# Altium PCB Kasli-DIOT.PCBDOC (part 15 of 23)
Units mm, origin at the board's own origin, x right, y up, seen from the top; angles counter-clockwise.
Board outline 222.9 x 100 mm, 10 copper layers (TopLayer, Layer 2, Layer 3, Layer 4, Layer 5, Layer 6, Layer 7, layer 8, Layer 9, BottomLayer), stack 1.564 mm thick; 977 components, 900 nets, 4676 pads, 2725 vias.
Unrouted connection lines stored in the file: 17.
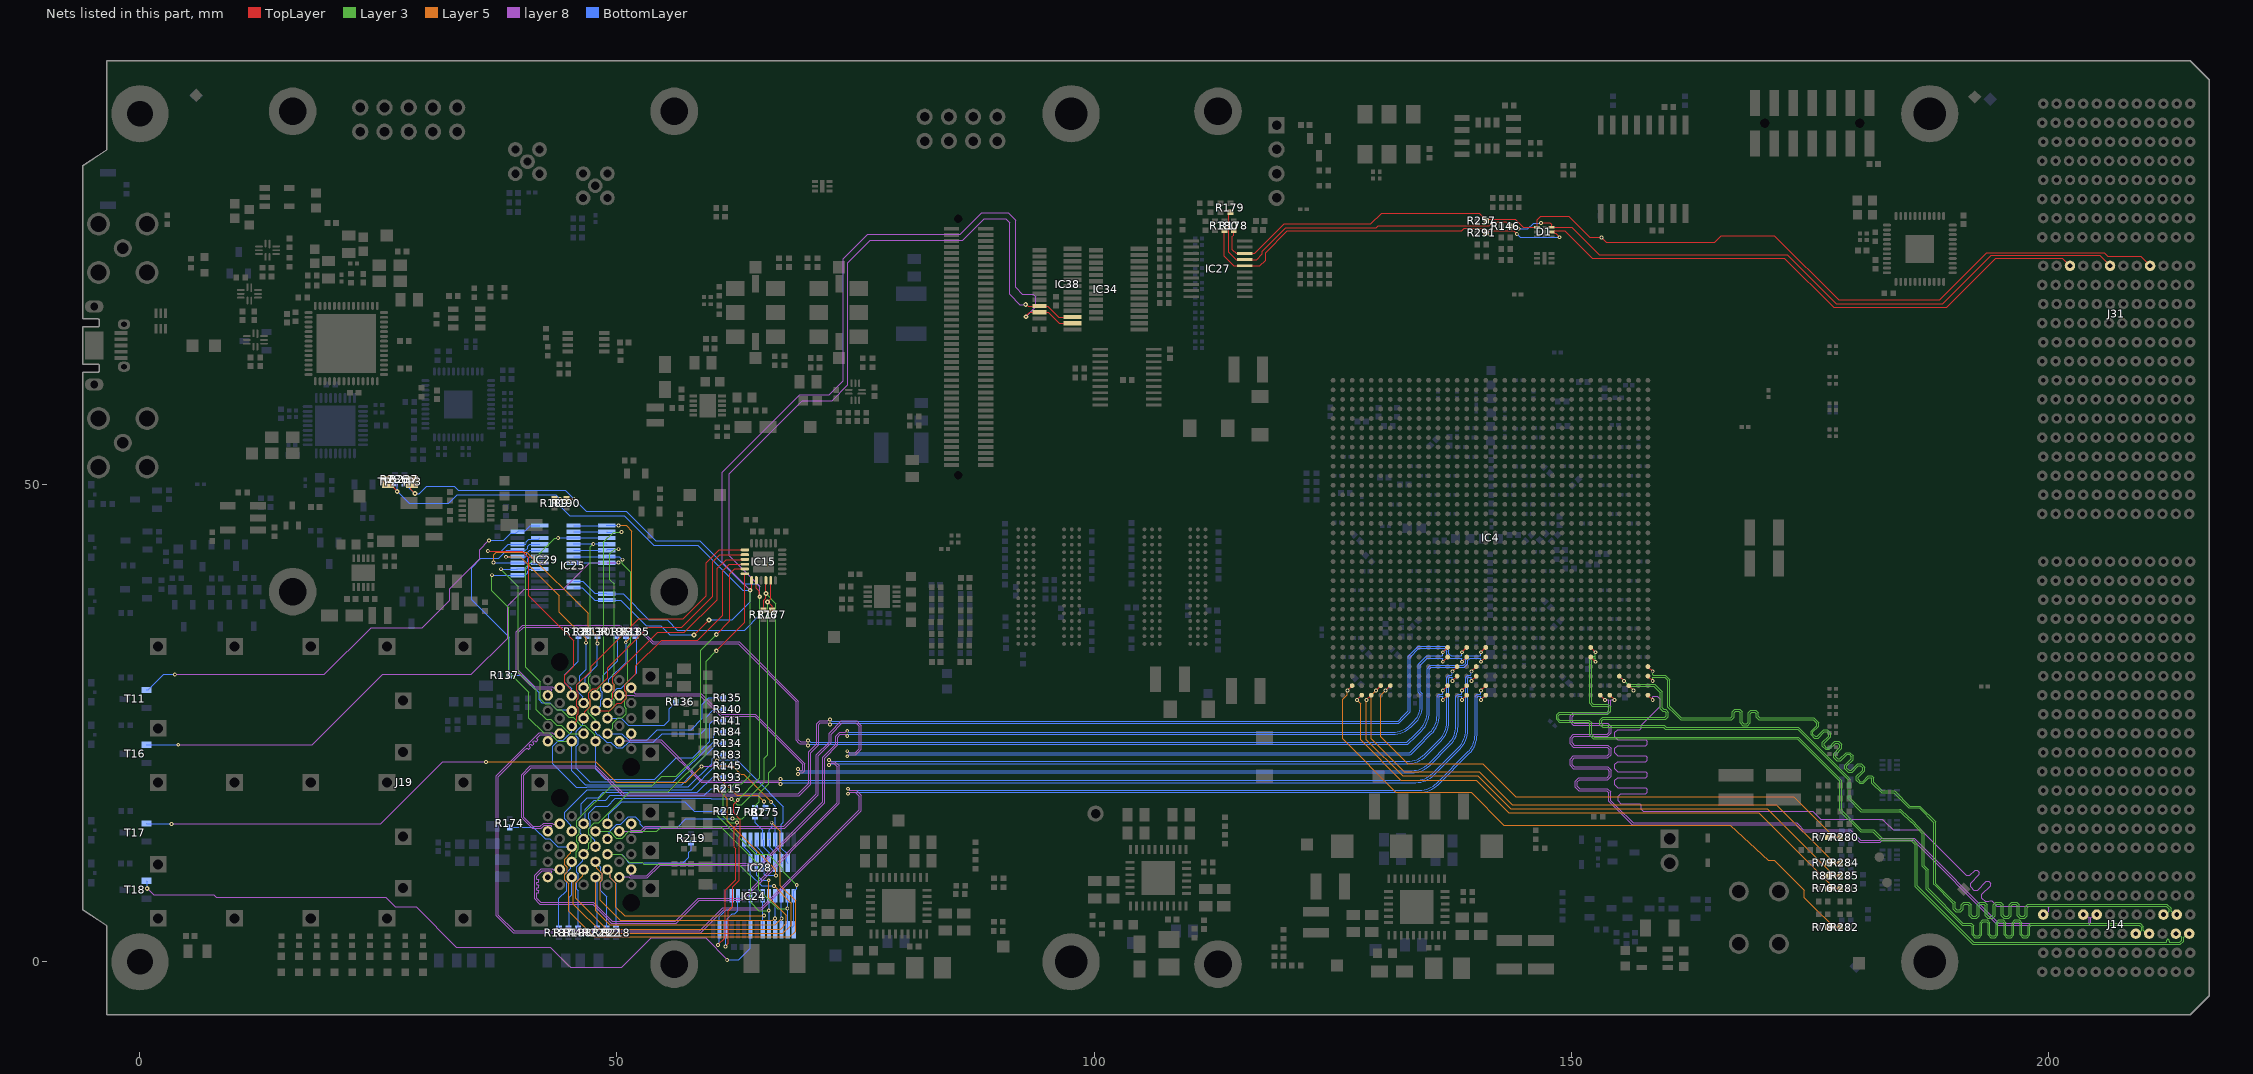
[diagram p21: the nets of this part, all layers, seen from the top]

## Via types
v1: diameter 0.4, hole 0.2, TopLayer to BottomLayer, tented both sides, 1723 vias
v2: diameter 0.5, hole 0.2, TopLayer to BottomLayer, tented both sides, 524 vias
v3: diameter 0.6, hole 0.3, TopLayer to BottomLayer, tented both sides, 172 vias
v4: diameter 0.6, hole 0.3, TopLayer to BottomLayer, 113 vias
v5: diameter 0.5, hole 0.2, TopLayer to BottomLayer, 107 vias
v6: diameter 0.4, hole 0.2, TopLayer to BottomLayer, 67 vias
v7: diameter 0.5, hole 0.25, TopLayer to BottomLayer, tented both sides, 12 vias
v8: diameter 0.8, hole 0.5, TopLayer to BottomLayer, tented both sides, 7 vias

## Nets (pads, with @x,y where several pads share a name; then routed paths per layer and width w, separated by ;. In a path a pad name is that pad's centre, name@x,y a point inside that pad or via, vN(x,y) a via of type N, cw(c..) or ccw(c..) an arc to the next point about the centre after c; other vN are vias at no path point) (continued)
SERVMOD.6_SERVMOD: D1.1 IC27.18 J31.D6 R178.1 R257.2 | length 108.6
  TopLayer w0.127: R178.1@114.647,76.689 114.647,76.174 114.51,76.037 114.51,74.648 114.897,74.261 IC27.18@115.797,74.261 116.835,74.261 119.922,77.347 129.015,77.347 130.139,78.471 140.358,78.471 141.132,77.697 R257.2@141.132,77.677 141.292,77.837 144.142,77.837 144.979,77 D1.1@146.451,77 146.451,77.771 146.832,78.152 149.755,78.152 151.982,75.925 v1(153.186,75.925) 153.673,75.438 165.074,75.438 165.748,76.112 171.329,76.112 178.038,69.403 188.674,69.403 193.575,74.304 205.907,74.304 206.261,73.95 209.7,73.95 J31.D6@210.7,72.95
SERVMOD.7_SERVMOD: D1.6 IC27.17 J31.G6 R146.2 R179.1 | length 105.6
  TopLayer w0.127: R179.1@114.286,78.593 114.142,78.448 114.142,74.366 114.897,73.611 IC27.17@115.797,73.611 117.039,73.611 117.648,74.22 117.648,74.5 120.098,76.95 129.597,76.95 129.781,77.134 141.42,77.134 141.852,77.566 143.171,77.566 143.625,77.112 R146.2@143.625,77.092 144.234,77.092 v1@144.511,76.816 ; v1(146.849,77.438) 146.876,77.466 147.793,77.466 147.971,77.288 D1.6@147.971,77 ; D1.6@147.977,77.006 150.079,77.006 152.955,74.13 172.664,74.13 177.814,68.981 188.973,68.981 194.042,74.05 205.4,74.05 J31.G6@206.5,72.95
  BottomLayer w0.127: v1(144.525,76.83) 145.459,76.83 146.067,77.438 v1(146.849,77.438)
SERVMOD.8_SERVMOD: D1.5 IC27.16 J31.J6 R180.1 R291.2 | length 102
  TopLayer w0.127: R180.1@113.659,76.689 113.659,73.948 114.647,72.961 IC27.16@115.797,72.961 117.389,72.961 117.986,73.558 117.986,74.345 120.281,76.639 138.563,76.639 138.832,76.907 140.543,76.907 140.565,76.885 140.694,76.885 141.132,76.448 R291.2@141.132,76.428 141.314,76.61 144.003,76.61 v1(144.318,76.295) ; D1.5@147.971,76.5 D1.5@148.136,76.5 ; v1(148.805,75.949) 148.4,76.354 148.282,76.354 D1.5@148.136,76.5 ; J31.J6@202.3,72.95 201.5,73.75 194.518,73.75 189.366,68.598 177.537,68.598 172.367,73.767 152.219,73.767 149.339,76.647 148.283,76.647 D1.5@148.136,76.5
  BottomLayer w0.127: v1(144.318,76.295) 144.672,75.941 148.797,75.941 v1(148.805,75.949)
SFP_0.LED: IC25.28 IC29.11 T11.1 | length 49.6
  layer 8 w0.1: v1(3.651,30.12) 19.331,30.12 24.245,35.034 29.574,35.034 32.465,37.925 32.465,39.099 35.591,42.224 35.591,43.187 v1(36.568,44.165)
  BottomLayer w0.1: T11.1@0.661,28.5 0.861,28.5 2.481,30.12 v1(3.651,30.12) ; v1(36.568,44.165) 36.57,44.163 38.124,44.163 38.861,44.9 39.383,44.9 39.681,45.198 40.374,45.198 40.891,45.716 41.898,45.716 IC25.28@41.908,45.725
SFP_0.LOS: IC25.26 IC29.9 J19.LB8 R138.1 | length 34.9
  TopLayer w0.125: v1(36.461,43.05) 40.061,43.05 40.761,42.35 40.761,38.35 45.461,33.65 45.461,30.96 44.514,30.013 44.514,29.242 45.167,28.589 45.167,28.008 J19.LB8@45.25,27.925
  BottomLayer w0.125: v1(36.461,43.05) 37.861,43.05 38.586,43.775 IC29.9@39.558,43.775 40.438,43.775 40.511,43.848 40.511,44.05 40.759,44.298 41.781,44.298 IC25.26@41.908,44.425 ; J19.LB8@45.25,27.925 45.25,28.624 45.061,28.813 44.955,28.813 44.537,29.23 44.537,30.099 45.947,31.508 R138.1@45.947,34.125
SFP_0.MOD_PRESENT: IC25.25 IC29.8 J19.LB6 R137.1 | length 29.9
  BottomLayer w0.125: IC25.25@41.908,43.775 40.861,43.775 40.636,43.55 40.636,43.372 40.397,43.133 39.566,43.133 IC29.8@39.558,43.125 38.436,43.125 37.591,42.28 35.741,42.28 34.761,41.3 34.761,37.945 38.701,34.005 R137.1@38.701,30.02 40.041,30.02 41.836,28.225 41.836,27.45 42.137,27.149 42.968,27.149 43.71,26.408 45.324,26.408 J19.LB6@45.411,26.32
SFP_0.RATE_SELECT: IC25.24 IC29.7 J19.LB7 R213.2 | length 25.1
  Layer 5 w0.125: v1(38.361,42.45) 39.861,42.45 43.961,38.35 43.961,36.65 46.761,33.85 v1(46.761,33.45)
  BottomLayer w0.125: v1(38.361,42.45) 39.533,42.45 IC29.7@39.558,42.475 40.436,42.475 40.561,42.6 40.561,42.825 40.869,43.133 41.9,43.133 IC25.24@41.908,43.125 ; J19.LB7@46.5,27.125 46.428,27.197 46.428,27.789 45.787,28.43 45.787,29.02 46.08,29.312 46.08,29.994 46.761,30.675 v1(46.761,33.45) 46.761,33.939 R213.2@46.947,34.125
SFP_0.RATE_SELECT1: IC25.23 IC29.6 J19.LB9 R130.2 | length 28.3
  Layer 5 w0.125: v1(37.061,41.85) 37.061,42.65 37.361,42.95 40.561,42.95 46.961,36.55 46.961,35.15 47.947,34.164 v1(47.947,33.35)
  BottomLayer w0.125: v1(37.061,41.85) 39.533,41.85 IC29.6@39.558,41.825 40.486,41.825 40.661,42 40.661,42.275 40.861,42.475 IC25.23@41.908,42.475 ; J19.LB9@46.661,28.72 46.661,29.8 47.947,31.086 v1(47.947,33.35) R130.2@47.947,34.125
SFP_0.SCL: IC15.2 J19.LB5 R184.1 | length 52.5
  TopLayer w0.125: J19.LB5@46.5,25.525 46.607,25.632 46.607,26.189 47.217,26.799 47.217,27.42 47.037,27.599 47.037,28.22 47.455,28.638 47.888,28.638 49.036,29.785 49.036,30.825 53.261,35.05 56.768,35.05 60.036,38.318 60.036,41.925 60.79,42.679 IC15.2@63.411,42.679
  BottomLayer w0.125: J19.LB5@46.5,25.525 46.428,25.453 46.428,24.861 45.736,24.169 45.736,23.649 45.962,23.423 45.962,22.83 45.736,22.603 45.736,20.275 47.161,18.85 55.918,18.85 60.142,23.073 60.142,23.781 60.453,24.092 R184.1@61.136,24.092
SFP_0.SDA: IC15.1 J19.LB4 R183.1 | length 56.2
  TopLayer w0.125: J19.LB4@45.25,24.725 45.787,25.263 45.787,25.82 45.962,25.995 45.962,26.62 45.787,26.795 45.787,27.455 45.962,27.63 45.962,28.22 45.787,28.395 45.787,29.02 47.283,30.516 47.283,30.96 52.273,35.95 56.941,35.95 59.361,38.37 59.361,41.825 60.715,43.179 IC15.1@63.411,43.179
  BottomLayer w0.125: J19.LB4@45.411,24.725 45.231,24.545 45.231,24.094 45.011,23.873 44.767,23.649 ccw(c45.25,23.125) 44.731,23.613 44.423,23.286 44.35,23.213 44.298,23.213 43.88,23.213 43.287,22.62 43.287,20.749 45.736,18.3 46.839,18.3 46.864,18.325 57.486,18.325 59.978,20.817 59.978,21.267 60.367,21.656 R183.1@61.136,21.656
SFP_0.TX_DISABLE: IC25.22 IC29.5 J19.LB3 | length 26.9
  Layer 3 w0.125: v1(37.837,41.158) 39.661,39.334 39.661,30.35 41.561,28.45 41.561,26.436 42.559,25.438 43.056,25.438 43.681,24.813 44.138,24.813 45.026,23.925 J19.LB3@46.661,23.925
  BottomLayer w0.125: v1(37.837,41.158) 39.54,41.158 IC29.5@39.558,41.175 40.486,41.175 40.636,41.325 40.636,41.55 40.869,41.783 41.865,41.783 IC25.22@41.908,41.825
SFP_0.TX_FAULT: IC25.21 IC29.4 J19.LB2 R134.1 | length 49.3
  Layer 3 w0.125: v1(36.911,40.525) 36.861,40.475 36.861,38.886 38.636,37.111 38.636,30.375 40.761,28.25 40.761,25.549 42.297,24.013 42.885,24.013 43.772,23.125 J19.LB2@45.411,23.125
  BottomLayer w0.125: v1(36.911,40.525) IC29.4@39.558,40.525 39.566,40.533 40.397,40.533 40.636,40.772 40.636,40.925 40.869,41.158 41.89,41.158 IC25.21@41.907,41.174 ; J19.LB2@45.25,23.125 45.25,20.011 46.686,18.575 56.786,18.575 57.911,19.7 57.911,20.239 60.576,22.904 R134.1@61.136,22.904
SFP_1.LED: IC25.7 IC29.19 T16.1 | length 63.5
  layer 8 w0.1: v1(4.011,22.75) 18.061,22.75 25.431,30.12 34.731,30.12 38.536,33.925 38.536,37.337 40.274,39.075 44.368,39.075 47.143,41.85 v1(50.161,41.85)
  BottomLayer w0.1: T16.1@0.661,22.75 v1(4.011,22.75) ; IC29.19@45.458,41.825 IC25.7@48.253,41.825 ; IC25.7@48.908,41.825 48.933,41.85 v1(50.161,41.85)
SFP_1.LOS: IC25.6 IC29.18 J19.LT8 R135.1 | length 39.7
  Layer 3 w0.1: J19.LT8@49,23.925 49.55,24.475 49.55,25.015 50.125,25.59 50.544,25.59 50.95,25.996 50.95,26.55 ; v1(50.561,42.15) 50.561,41.75 51.461,40.85 51.461,33.45 51.111,33.1 51.111,29.326 50.8,29.015 50.8,28.435 51,28.235 51,27.615 50.8,27.415 50.8,26.758 cw(c50.25,26.325) 50.834,26.711 50.922,26.578 50.95,26.55
  BottomLayer w0.1: IC25.6@48.908,42.475 50.236,42.475 v1(50.561,42.15) ; J19.LT8@49.161,23.925 50.51,23.925 51.21,23.225 53.111,23.225 54.236,24.35 57.761,24.35 58.961,25.55 58.961,26.975 59.642,27.656 R135.1@61.136,27.656
  BottomLayer w0.125: IC29.18@45.458,42.475 IC25.6@48.271,42.475
SFP_1.MOD_PRESENT: IC25.5 IC29.17 J19.LT6 R136.1 | length 32.3
  Layer 3 w0.125: J19.LT6@49.161,25.525 49.161,26.275 49.537,26.652 49.537,26.655 49.712,26.83 49.712,27.449 49.451,27.711 49.451,28.133 49.712,28.395 49.712,29.02 49.705,29.027 49.705,29.062 49.537,29.23 49.537,30.114 49.698,30.275 49.698,39.613 49.261,40.05 49.261,42.75 49.761,43.25 v1(50.161,43.25)
  BottomLayer w0.125: IC29.17@45.458,43.125 IC25.5@48.332,43.125 ; IC25.5@48.908,43.125 49.033,43.25 v1(50.161,43.25) ; J19.LT6@49.161,25.52 49.166,25.525 50.467,25.525 51.185,24.808 54.968,24.808 55.461,25.3 55.461,26.545 56.146,27.23 R136.1@56.146,27.25
SFP_1.RATE_SELECT: IC25.4 IC29.16 J19.LT7 R140.2 | length 40.6
  Layer 3 w0.1: v1(47.518,43.795) 47.211,43.488 47.211,29.976 47.05,29.815 47.05,29.165 47.2,29.015 47.2,28.736 47.211,28.725 47.211,28.376 47.05,28.215 47.05,27.635 47.214,27.471 47.214,27.378 47.211,27.375 47.211,26.776 46.983,26.548 46.983,26.102 47.719,25.366 47.719,24.756 J19.LT7@47.75,24.725 ; J19.LT7@47.821,24.815 J19.LT7@47.911,24.725
  BottomLayer w0.1: IC29.16@45.458,43.775 45.478,43.795 v1(47.518,43.795) 48.887,43.795 IC25.4@48.908,43.775 ; J19.LT7@47.75,24.725 47.75,24.015 47.94,23.825 48.11,23.825 48.91,23.025 49.36,23.025 49.96,22.425 50.61,22.425 51.21,23.025 51.951,23.025 51.966,23.01 53.821,23.01 54.736,23.925 58.761,23.925 59.336,24.5 59.336,25.65 60.154,26.468 R140.2@61.136,26.468
SFP_1.RATE_SELECT1: IC25.3 IC29.15 J19.LT9 R141.2 | length 51.7
  Layer 3 w0.125: v1(43.833,44.425) 43.78,44.373 43.484,44.373 40.461,41.35 40.461,30.85 41.956,29.355 41.956,28.933 41.954,28.93 41.954,28.494 41.954,27.565 42.481,27.038 43.062,27.038 43.687,26.413 44.135,26.413 44.935,25.613 45.395,25.613 46.195,24.813 46.637,24.813 47.66,23.789 47.66,23.376 J19.LT9@47.911,23.125
  BottomLayer w0.125: v1(43.833,44.425) IC29.15@45.457,44.425 ; IC29.15@45.458,44.425 IC25.3@48,44.425 ; J19.LT9@47.75,23.125 47.75,20.161 48.761,19.15 53.961,19.15 56.201,21.39 57.959,21.39 59.711,23.142 59.711,24.936 60.054,25.28 R141.2@61.136,25.28 ; IC25.3@48.908,44.425 IC25.3@48.933,44.45
SFP_1.SCL: IC15.4 J19.LT5 R186.1 | length 35
  TopLayer w0.125: J19.LT5@47.911,26.32 49.237,26.32 50.037,27.12 50.453,27.12 50.962,27.63 50.962,28.238 50.787,28.413 50.787,29.02 51.97,30.203 51.97,31.009 54.686,33.725 58.461,33.725 61.086,36.35 61.086,40.975 61.79,41.679 IC15.4@63.411,41.679
  BottomLayer w0.125: J19.LT5@47.75,26.325 48.287,26.863 48.287,27.454 48.462,27.629 48.462,28.255 48.287,28.43 48.287,29.02 48.536,29.269 48.536,30.05 50.061,31.575 R186.1@50.061,34.125
SFP_1.SDA: IC15.3 J19.LT4 R185.1 | length 32.5
  TopLayer w0.125: J19.LT4@49,27.125 49.033,27.125 49.537,27.63 49.537,28.255 49.712,28.43 49.712,29.038 49.537,29.213 49.537,29.82 54.25,34.533 57.066,34.533 60.511,37.978 60.511,41.25 61.431,42.17 IC15.3@63.403,42.17
  BottomLayer w0.125: J19.LT4@49,27.125 49.033,27.125 49.537,27.63 49.537,28.22 50.018,28.701 50.438,28.701 52.061,30.324 R185.1@52.061,34.125
SFP_1.TX_DISABLE: IC25.2 IC29.14 J19.LT3 | length 22.8
  Layer 3 w0.125: J19.LT3@47.911,27.925 47.931,27.945 47.931,28.537 48.287,28.894 48.287,29.02 48.623,29.356 48.623,44.013 49.661,45.05 v1(50.461,45.05)
  BottomLayer w0.125: IC29.14@45.458,45.075 IC25.2@48.078,45.075 ; IC25.2@48.908,45.075 48.933,45.05 v1(50.461,45.05)
SFP_1.TX_FAULT: IC25.1 IC29.13 J19.LT2 R133.1 | length 23.6
  Layer 5 w0.125: v1(50.161,45.75) 50.961,45.75 51.561,45.15 51.561,34.129 v1(50.922,33.489)
  BottomLayer w0.125: IC29.13@45.458,45.725 IC25.1@48.096,45.725 ; IC25.1@48.908,45.725 48.933,45.75 v1(50.161,45.75) ; J19.LT2@49.161,28.72 49.161,29.625 50.945,31.409 R133.1@50.945,34.124
SFP_2.A_RATE_SELECT: IC24.24 IC28.7 R82.1 | length 5.3
  BottomLayer w0.125: R82.1@64.486,15.19 64.486,14.579 65.286,13.779 IC28.7@65.286,12.825 ; IC28.7@65.375,12.736 65.375,11.986 65.936,11.425 IC24.24@65.936,10.35
SFP_2.LED: IC24.27 IC28.10 T17.1 | length 79.6
  Layer 5 w0.1: v1(36.277,20.95) 47.761,20.95 49.906,18.805 57.191,18.805 v1(58.861,20.475)
  layer 8 w0.1: v1(3.288,14.45) 25.261,14.45 31.761,20.95 v1(36.277,20.95) ; v1(58.861,20.475) 59.863,20.475 v1(60.481,21.093)
  BottomLayer w0.1: T17.1@0.661,14.5 0.711,14.45 v1(3.288,14.45)
  BottomLayer w0.125: v1(60.481,21.093) 60.547,21.159 62.529,21.159 64.467,19.222 64.467,19.219 67.424,16.262 67.424,14.613 67.236,14.425 IC28.10@67.236,12.825 67.236,11.9 67.77,11.366 67.77,10.466 IC24.27@67.886,10.35
SFP_2.LOS: IC24.26 IC28.9 J19.RB8 R145.1 | length 35
  Layer 5 w0.125: v1(60.566,20.528) 62.083,20.528 62.961,19.65 63.274,19.65 66.161,16.763 v1(66.161,16.75)
  BottomLayer w0.125: J19.RB8@45.25,13.675 45.178,13.747 45.178,14.339 44.537,14.98 44.537,15.68 46.907,18.05 57.811,18.05 60.289,20.528 v1(60.566,20.528) R145.1@61.136,20.528 ; J19.RB8@45.389,13.739 ccw(c45.513,13.747) J19.RB8@45.411,13.675 ; v1(66.161,16.75) 66.586,16.325 IC28.9@66.586,12.825 ; IC28.9@66.625,12.786 66.625,11.986 67.222,11.389 67.222,10.364 IC24.26@67.236,10.35 ; IC24.26@67.214,10.328 IC24.26@67.275,10.267
SFP_2.MOD_PRESENT: IC24.25 IC28.8 J19.RB6 R174.1 | length 56.9
  Layer 5 w0.125: J19.RB6@45.25,12.075 45.178,12.003 45.178,11.411 44.537,10.77 44.537,10.18 44.81,9.907 44.81,9.443 44.537,9.17 44.537,8.58 44.93,8.188 44.93,5.281 47.598,2.613 68.124,2.613 68.727,3.216 68.727,6.384 67.136,7.975 67.136,13.666 v1(66.215,14.586)
  BottomLayer w0.125: R174.1@38.761,14.08 38.773,14.092 41.2,14.092 41.887,13.405 41.966,13.405 42.472,12.899 42.969,12.899 43.792,12.075 J19.RB6@45.241,12.075 ; IC28.8@65.936,12.825 65.936,13.825 66.261,14.15 66.261,14.541 v1(66.215,14.586) ; IC28.8@66,12.761 66,11.986 66.586,11.4 IC24.25@66.586,10.35
SFP_2.RATE_SELECT: J19.RB7 R82.2 R175.2 R193.2 | length 28.1
  Layer 5 w0.125: v1(60.533,19.476) 62.559,17.45 64.761,17.45 v1(65.411,16.8)
  BottomLayer w0.125: J19.RB7@46.5,12.875 46.5,13.075 46.123,13.452 46.123,13.844 45.787,14.18 45.787,14.77 46.261,15.244 46.261,16.58 46.764,17.083 46.764,17.103 46.877,17.216 48.027,17.216 48.561,17.75 58.436,17.75 60.162,19.476 v1(60.533,19.476) 61,19.476 R193.2@61.136,19.34 ; R82.2@64.486,16.13 R175.2@65.56,16.13 65.411,16.278 v1(65.411,16.8)
SFP_2.RATE_SELECT1: IC24.23 IC28.6 J19.RB9 R215.2 | length 33.7
  Layer 5 w0.125: v1(60.499,18.166) 61.561,17.104 61.561,14.75 66.661,9.65 v1(66.661,9.05)
  BottomLayer w0.125: J19.RB9@46.661,14.47 46.661,15.98 47.631,16.95 48.811,16.95 49.311,17.45 59.161,17.45 59.877,18.166 v1(60.499,18.166) 61.122,18.166 R215.2@61.136,18.152 ; IC28.6@64.7,12.761 64.7,11.986 65.286,11.4 IC24.23@65.286,10.35 65.449,10.188 65.449,9.162 65.561,9.05 v1(66.661,9.05)
SFP_2.SCL: IC15.6 J19.RB5 R188.1 | length 47.8
  TopLayer w0.125: v5(60.411,32.6) 63.411,35.6 IC15.6@63.411,40.679 IC15.6@63.13,40.679
  Layer 3 w0.125: J19.RB5@46.661,11.275 46.661,11.505 46.983,11.827 46.983,11.834 47.037,11.889 47.037,12.405 47.294,12.661 47.294,13.124 47.037,13.38 47.037,13.97 47.63,14.563 48.074,14.563 51.324,17.812 55.391,17.812 59.336,21.758 59.336,31.525 v5(60.411,32.6)
  BottomLayer w0.125: R188.1@45.913,3.525 45.913,7.473 45.761,7.625 45.761,8.344 45.962,8.545 45.962,9.205 45.787,9.38 45.787,9.97 46.428,10.611 46.428,11.203 J19.RB5@46.5,11.275 ; J19.RB5@46.617,11.226 J19.RB5@46.661,11.27
SFP_2.SDA: IC15.5 J19.RB4 R187.1 | length 50.3
  TopLayer w0.125: v5(60.411,34.3) 61.836,35.725 61.836,40.675 62.34,41.179 IC15.5@63.411,41.179
  Layer 3 w0.125: J19.RB4@45.25,10.475 45.25,10.485 45.715,10.95 45.715,11.532 45.962,11.78 45.962,12.405 45.787,12.58 45.787,13.17 46.036,13.419 46.036,13.931 45.787,14.18 45.787,14.713 45.788,14.765 45.948,14.926 45.948,14.996 49.428,18.476 53.691,18.476 54.665,19.45 56.236,19.45 58.761,21.975 58.761,32.65 v5(60.411,34.3)
  BottomLayer w0.125: R187.1@43.913,3.525 43.913,6.672 44.712,7.472 44.712,8.388 44.537,8.563 44.537,9.17 45.178,9.811 45.178,10.403 J19.RB4@45.25,10.475
SFP_2.TX_DISABLE: IC24.22 IC28.5 J19.RB3 | length 37.6
  Layer 5 w0.125: J19.RB3@46.5,9.675 46.428,9.603 46.428,9.011 45.7,8.283 45.7,6.663 48.93,3.433 67.144,3.433 67.761,4.05 67.761,4.867 65.903,6.724 v1(65.903,8.55)
  BottomLayer w0.125: IC28.5@64.119,12.692 64.119,11.992 64.636,11.475 IC24.22@64.636,10.35 64.636,9.075 65.161,8.55 v1(65.903,8.55)
SFP_2.TX_FAULT: IC24.21 IC28.4 J19.RB2 R144.1 | length 44.3
  Layer 5 w0.125: J19.RB2@45.411,8.875 45.411,6.052 48.493,2.97 67.388,2.97 68.261,3.843 68.261,6.15 v1(66.461,7.95)
  BottomLayer w0.125: R144.1@44.914,3.43 45.008,3.525 45.008,6.767 45.25,7.009 J19.RB2@45.25,8.875 ; IC28.4@63.35,12.811 63.35,11.986 63.947,11.389 63.947,10.739 IC24.21@63.986,10.7 ; IC24.21@63.986,10.35 63.986,9.125 65.161,7.95 v1(66.461,7.95)
SFP_3.LED: IC24.8 IC28.20 T18.1 | length 75.7
  layer 8 w0.125: v2(0.755,7.693) 1.435,7.013 7.718,7.013 7.98,6.75 25.761,6.75 26.761,5.75 28.955,5.75 33.158,1.547 43.016,1.547 44.911,-0.348 ; 44.913,-0.35 45.138,-0.575 50.506,-0.575 53.581,2.5 59.277,2.5 61.549,0.229 v1(61.549,0.2)
  BottomLayer w0.125: T18.1@0.661,8.5 0.755,8.406 v2(0.755,7.693) ; v1(61.549,0.2) 62.74,0.2 63.986,1.446 IC24.8@63.986,3.35 IC28.20@63.986,6.925
SFP_3.LOS: IC24.6 IC28.18 J19.RT8 R218.1 | length 30.2
  Layer 5 w0.125: J19.RT8@49.161,9.675 49.306,9.53 49.306,8.788 49.873,8.22 49.873,5.737 50.791,4.82 65.381,4.82 v1(65.411,4.85)
  BottomLayer w0.125: J19.RT8@49.161,9.675 49.306,9.53 49.306,8.786 49.913,8.179 R218.1@49.913,3.525 ; IC24.6@65.286,3.35 IC28.18@65.286,6.925
SFP_3.MOD_PRESENT: IC24.5 IC28.17 J19.RT6 R219.1 | length 35
  Layer 3 w0.125: J19.RT6@49.161,11.275 50.459,11.275 51.309,10.425 52.655,10.425 52.83,10.25 62.736,10.25 64.013,8.974 64.013,6.232 64.878,5.367 v1(65.903,5.367)
  BottomLayer w0.125: J19.RT6@49.161,11.275 50.502,11.275 50.79,10.94 cw(c50.25,10.475) 50.805,10.921 51.176,10.46 51.213,10.424 51.249,10.387 51.476,10.387 cw(c51.5,9.675) 51.524,10.387 56.959,10.387 57.53,10.958 57.53,11.488 57.761,11.719 R219.1@57.761,12.476 ; IC24.5@65.936,3.35 65.936,4.575 IC28.17@65.936,6.925
SFP_3.RATE_SELECT: IC24.4 IC28.16 J19.RT7 R222.2 | length 34.2
  Layer 5 w0.125: J19.RT7@47.75,10.475 47.857,10.368 47.857,9.811 48.462,9.205 48.462,8.58 48.252,8.37 48.252,6.459 48.289,6.422 50.343,4.368 66.35,4.368 66.532,4.55 v1(66.561,4.55)
  BottomLayer w0.125: J19.RT7@47.75,10.475 48.287,9.938 48.287,9.38 48.462,9.205 48.462,8.58 48.287,8.405 48.287,7.424 48.913,6.798 R222.2@48.913,3.525 ; IC24.4@66.586,3.935 IC28.16@66.586,6.925
SFP_3.RATE_SELECT1: IC24.3 IC28.15 J19.RT9 R223.2 | length 32.2
  Layer 5 w0.125: J19.RT9@47.75,8.875 47.75,5.361 49.216,3.895 66.606,3.895 v1(67.261,4.55)
  BottomLayer w0.125: R223.2@47.911,3.525 J19.RT9@47.911,8.87 ; IC24.3@67.236,4.021 IC28.15@67.236,6.925
SFP_3.SCL: IC15.11 J19.RT5 R177.1 | length 46.8
  TopLayer w0.125: IC15.11@66.111,39.979 66.111,38.054 v2(65.782,37.725) 66.261,37.246 R177.1@66.261,36.837
  Layer 3 w0.125: v1(61.999,17.083) 62.631,16.45 63.061,16.45 65.411,18.8 65.411,21.354 65.782,21.725 v2(65.782,37.725)
  BottomLayer w0.125: J19.RT5@47.75,12.075 47.678,12.147 47.678,12.739 47.037,13.38 47.037,13.97 47.219,14.151 47.219,14.799 47.037,14.98 47.037,15.57 47.795,16.328 49.013,16.328 49.836,17.15 59.811,17.15 59.878,17.083 v1(61.999,17.083)
SFP_3.SDA: IC15.10 J19.RT4 R176.1 | length 45.1
  TopLayer w0.125: R176.1@65.375,36.837 65.375,37.477 65.37,37.483 65.37,37.896 65.608,38.135 v2(65.608,38.608) v2(65.608,38.608) 65.61,39.975 IC15.10@65.608,39.976
  Layer 3 w0.125: v1(62.105,15.006) 63.117,15.006 64.91,16.799 64.91,17.648 65.903,18.642 65.903,19.795 66.661,20.553 66.661,37.555 v2(65.608,38.608)
  BottomLayer w0.125: J19.RT4@49.161,12.87 49.183,12.892 49.183,13.623 49.985,14.425 50.416,14.425 51.179,15.188 51.934,15.188 52.073,15.048 52.424,14.698 52.424,14.442 52.788,14.079 56.295,14.079 57.222,15.006 v1(62.105,15.006)
SFP_3.TX_DISABLE: IC24.2 IC28.14 J19.RT3 | length 29.4
  Layer 3 w0.125: J19.RT3@47.911,13.675 49.23,13.675 49.943,12.963 50.552,12.963 51.25,13.66 54.167,13.66 54.665,14.158 60.872,14.158 64.878,10.152 64.878,7.567 66.866,5.579 v1(67.852,5.579)
  BottomLayer w0.125: IC24.2@67.886,3.35 IC28.14@67.886,6.925
SFP_3.TX_FAULT: IC24.1 IC28.13 J19.RT2 R217.1 | length 30.6
  Layer 3 w0.125: v1(60.486,15.78) 60.538,15.727 60.538,15.273 64.525,11.286 65.875,11.286 67.333,9.828 67.333,9.556 v1(68.844,8.045)
  BottomLayer w0.125: J19.RT2@49.161,14.47 49.161,15.48 50.481,16.8 57.086,16.8 58.11,15.776 60.482,15.776 v1(60.486,15.78) 61.132,15.78 R217.1@61.136,15.776 ; IC24.1@68.374,3.616 68.584,3.826 68.584,4.209 68.536,4.258 68.536,7.425 68.698,7.587 68.744,7.587 68.817,7.661 68.817,8.019 v1(68.844,8.045)
SFP_RX_TX_0.RD_N: IC4.AK17 J19.LB12 | length 126.1
  TopLayer w0.095: v1(140.561,31.45) IC4.AK17@141.061,31.95
  layer 8 w0.075: J19.LB12@44.161,28.725 44.143,28.707 43.296,28.707 43.193,28.81 41.386,28.81 39.661,30.536 39.661,34.525 40.216,35.08 50.231,35.08 50.479,34.832 52.218,34.832 53.727,33.323 62.711,33.323 68.786,27.248 68.786,23.214 69.018,22.982 69.158,22.842 69.83,22.842 69.992,22.68 v1(70.036,22.68)
  BottomLayer w0.095: v1(70.036,22.68) 70.119,22.68 70.22,22.781 131.678,22.781 132.892,22.781 133.751,23.64 134.353,24.242 ccw(c132.402,26.193) 134.355,24.244 ccw(c132.402,26.193) 135.161,26.193 135.161,30.65 135.361,30.85 138.805,30.85 139.184,31.229 139.184,31.602 139.42,31.839 139.9,31.839 140.505,31.839 140.561,31.783 v1(140.561,31.45)
SFP_RX_TX_0.RD_P: IC4.AJ17 J19.LB13 | length 126.5
  TopLayer w0.095: v1(140.561,32.45) IC4.AJ17@141.061,32.95
  layer 8 w0.075: J19.LB13@42.911,27.925 42.911,28.202 43.154,28.445 43.154,28.565 43.11,28.608 41.303,28.608 40.636,29.275 40.493,29.418 39.459,30.452 39.459,34.609 40.133,35.282 50.314,35.282 50.379,35.218 50.563,35.034 52.302,35.034 53.811,33.525 62.795,33.525 68.988,27.332 68.988,23.298 69.242,23.044 69.83,23.044 69.992,23.207 v1(70.036,23.207)
  BottomLayer w0.095: v1(70.036,23.207) 70.092,23.207 70.288,23.01 131.693,23.01 132.807,23.01 133.595,23.798 134.195,24.398 ccw(c132.399,26.194) 134.939,26.194 134.939,30.742 135.269,31.072 138.713,31.072 138.962,31.321 138.962,31.694 139.328,32.061 139.992,32.061 140.505,32.061 140.561,32.117 v1(140.561,32.45)
SFP_RX_TX_0.TD_N: IC4.AP17 J19.LB19 | length 144.8
  TopLayer w0.095: v1(140.561,27.45) IC4.AP17@141.061,27.95
  layer 8 w0.075: J19.LB19@42.911,23.125 42.911,23.402 43.154,23.645 43.154,23.765 43.11,23.808 41.944,23.808 41.736,23.6 41.586,23.45 41.586,23.388 41.683,23.292 41.683,23.231 41.543,23.091 41.483,23.091 41.385,23.189 41.325,23.189 41.185,23.049 41.185,22.989 41.283,22.891 41.283,22.831 41.143,22.691 41.083,22.691 40.985,22.789 40.925,22.789 40.785,22.649 40.785,22.589 40.883,22.491 40.883,22.431 40.743,22.291 40.683,22.291 40.586,22.388 40.524,22.388 40.297,22.161 37.555,19.419 37.555,4.906 39.223,3.238 58.699,3.238 61.111,5.65 65.111,5.65 75.386,15.925 75.386,17.364 74.971,17.78 74.417,17.78 74.255,17.617 v1(74.211,17.617)
  BottomLayer w0.095: v1(74.211,17.617) 74.267,17.617 74.407,17.757 ; 74.394,17.77 74.406,17.758 76.58,17.758 133.878,17.758 134.126,17.758 ccw(c134.126,20.518) 136.077,18.566 139.349,21.838 ccw(c137.397,23.79) 140.158,23.79 140.158,27.747 140.25,27.839 140.505,27.839 140.561,27.783 v1(140.561,27.45)
SFP_RX_TX_0.TD_P: IC4.AN17 J19.LB18 | length 145.4
  TopLayer w0.095: v1(140.561,28.45) IC4.AN17@141.061,28.95
  layer 8 w0.075: J19.LB18@44.161,23.925 44.143,23.907 43.296,23.907 43.193,24.011 41.861,24.011 37.353,19.503 37.353,4.822 39.139,3.036 58.783,3.036 61.195,5.448 65.195,5.448 75.588,15.841 75.588,17.448 75.054,17.982 74.417,17.982 74.255,18.144 v1(74.211,18.144)
  BottomLayer w0.095: v1(74.211,18.144) 74.267,18.144 74.419,17.992 74.486,17.992 74.498,17.98 76.58,17.98 133.786,17.98 134.125,17.98 ccw(c134.125,20.52) 135.919,18.722 ccw(c134.125,20.52) 135.921,18.724 139.192,21.995 ccw(c137.395,23.791) 139.193,21.996 ccw(c137.395,23.791) 139.935,23.791 139.935,24.95 139.936,27.838 140.158,28.061 140.505,28.061 140.561,28.117 v1(140.561,28.45)
SFP_RX_TX_1.RD_N: IC4.AM16 J19.LT12 | length 100.2
  TopLayer w0.095: v1(139.561,29.45) IC4.AM16@140.061,29.95
  layer 8 w0.075: J19.LT12@50.411,23.125 50.45,23.164 51.255,23.164 51.358,23.06 54.551,23.06 58.812,18.799 66.93,18.799 67.092,18.637 v1(67.136,18.637)
  BottomLayer w0.095: v1@67.243,18.724 67.308,18.789 76.16,18.789 76.161,18.79 133.228,18.79 133.701,18.79 ccw(c133.701,21.543) 135.646,19.595 ccw(c133.701,21.543) 135.648,19.596 138.379,22.328 ccw(c136.431,24.276) 138.38,22.329 ccw(c136.431,24.276) 139.186,24.276 139.186,29.742 139.283,29.839 139.505,29.839 139.561,29.783 v1(139.561,29.45)
SFP_RX_TX_1.RD_P: IC4.AL16 J19.LT13 | length 100.1
  TopLayer w0.095: v1(139.561,30.45) IC4.AL16@140.061,30.95
  layer 8 w0.075: J19.LT13@51.661,23.925 51.661,23.648 51.397,23.384 51.397,23.306 51.441,23.262 54.634,23.262 58.896,19.001 66.93,19.001 67.092,19.164 v1(67.136,19.164)
  BottomLayer w0.095: v1(67.136,19.164) 67.156,19.164 67.308,19.011 76.068,19.011 76.069,19.012 76.161,19.012 133.136,19.012 133.697,19.012 ccw(c133.697,21.552) 135.492,19.754 ccw(c133.697,21.552) 135.493,19.756 138.221,22.483 ccw(c136.424,24.279) 138.964,24.279 138.964,29.834 139.191,30.061 139.505,30.061 139.561,30.117 v1(139.561,30.45)
SFP_RX_TX_1.TD_N: IC4.AP15 J19.LT19 | length 99.4
  TopLayer w0.095: v1(138.561,27.45) IC4.AP15@139.061,27.95
  layer 8 w0.075: J19.LT19@51.661,28.725 51.852,28.534 51.852,28.129 51.896,28.085 58.826,28.085 60.958,25.953 64.516,25.953 69.691,20.779 69.691,20.044 69.482,19.835 69.192,19.835 69.03,19.673 v1(68.986,19.673)
  BottomLayer w0.095: v1(68.986,19.673) 69.016,19.673 69.169,19.825 71.401,19.825 133.299,19.825 ccw(c133.299,22.546) 135.223,20.622 137.352,22.751 ccw(c135.401,24.703) 137.354,22.753 ccw(c135.401,24.703) 138.161,24.703 138.161,27.75 138.25,27.839 138.505,27.839 138.561,27.783 v1(138.561,27.45)
SFP_RX_TX_1.TD_P: IC4.AN15 J19.LT18 | length 99.5
  TopLayer w0.095: v1(138.561,28.45) IC4.AN15@139.061,28.95
  layer 8 w0.075: J19.LT18@50.411,27.925 50.429,27.943 51.753,27.943 51.813,27.883 58.742,27.883 60.874,25.751 64.433,25.751 69.489,20.695 69.489,20.144 69.382,20.037 69.192,20.037 69.03,20.2 v1(68.986,20.2)
  BottomLayer w0.095: v1(68.986,20.2) 69.016,20.2 69.169,20.047 71.401,20.047 133.298,20.047 ccw(c133.298,22.548) 135.067,20.78 ccw(c133.273,22.577) 135.069,20.781 137.195,22.908 ccw(c135.399,24.704) 137.197,22.909 ccw(c135.399,24.704) 137.939,24.704 137.939,27.842 138.158,28.061 138.505,28.061 138.561,28.117 v1(138.561,28.45)
SFP_RX_TX_2.RD_N: IC4.AK15 J19.RB12 | length 123.6
  TopLayer w0.095: v1(138.561,31.45) IC4.AK15@139.061,31.95
  layer 8 w0.075: J19.RB12@44.161,14.475 44.122,14.436 43.317,14.436 43.214,14.54 42.304,14.54 41.957,14.193 41.179,14.193 40.211,15.161 40.211,19.55 40.986,20.325 47.711,20.325 50.613,17.423 69.095,17.423 70.309,18.637 70.309,21.915 71.161,22.767 71.161,24.875 71.329,25.043 72.105,25.043 72.267,24.88 v1(72.311,24.88)
  BottomLayer w0.095: v1(72.311,24.88) 72.386,24.88 72.519,25.013 131.963,25.013 132.562,25.613 133.161,26.212 133.161,27.059 133.161,27.063 133.161,31.95 134.061,32.85 136.691,32.85 136.926,32.615 136.964,32.576 136.964,32.203 137.328,31.839 138,31.839 138.505,31.839 138.561,31.783 v1(138.561,31.45)
SFP_RX_TX_2.RD_P: IC4.AJ15 J19.RB13 | length 123.9
  TopLayer w0.095: v1(138.561,32.45) IC4.AJ15@139.061,32.95
  layer 8 w0.075: J19.RB13@42.911,13.675 42.911,13.952 43.175,14.216 43.175,14.294 43.131,14.338 42.387,14.338 42.041,13.991 41.095,13.991 40.009,15.077 40.009,19.634 40.902,20.527 47.795,20.527 50.697,17.625 69.011,17.625 70.107,18.721 70.107,21.998 70.959,22.851 70.959,24.959 71.245,25.245 72.105,25.245 72.267,25.407 v1(72.311,25.407)
  BottomLayer w0.095: v1(72.311,25.407) 72.358,25.407 72.53,25.235 131.867,25.235 132.403,25.771 132.939,26.308 132.939,27.066 132.939,32.042 133.969,33.072 136.783,33.072 137.186,32.668 137.186,32.295 137.42,32.061 138.092,32.061 138.505,32.061 138.561,32.117 v1(138.561,32.45)
SFP_RX_TX_2.TD_N: IC4.AM14 J19.RB19 | length 121.8
  TopLayer w0.095: v1(137.561,29.45) IC4.AM14@138.061,29.95
  layer 8 w0.075: J19.RB19@42.911,8.875 42.911,9.152 43.154,9.395 43.154,9.515 43.11,9.559 42.157,9.559 41.563,8.964 41.563,8.725 41.563,8.679 41.607,8.636 41.744,8.636 41.786,8.593 41.786,8.395 41.744,8.353 41.605,8.353 41.563,8.31 41.563,8.112 41.605,8.07 41.744,8.07 41.786,8.027 41.786,7.829 41.744,7.787 41.605,7.787 41.563,7.744 41.563,7.546 41.605,7.504 41.744,7.504 41.786,7.461 41.786,7.263 41.744,7.221 41.607,7.221 41.563,7.177 41.563,6.856 41.563,6.673 41.836,6.4 42.011,6.225 47.522,6.225 48.879,4.868 49.495,4.252 56.113,4.252 58.536,6.675 63.075,6.675 73.086,16.686 73.086,20.45 72.741,20.795 72.442,20.795 72.28,20.632 v1(72.236,20.632)
  BottomLayer w0.095: v1(72.236,20.632) 72.284,20.632 72.436,20.785 72.472,20.785 72.478,20.779 132.859,20.779 ccw(c132.859,23.537) 134.81,21.587 136.378,23.155 ccw(c134.426,25.107) 136.38,23.157 ccw(c134.426,25.107) 137.186,25.107 137.186,29.725 137.301,29.839 137.505,29.839 137.561,29.783 v1(137.561,29.45)
SFP_RX_TX_2.TD_P: IC4.AL14 J19.RB18 | length 122.4
  TopLayer w0.095: v1(137.561,30.45) IC4.AL14@138.061,30.95
  layer 8 w0.075: J19.RB18@44.161,9.675 44.143,9.657 43.296,9.657 43.193,9.761 42.074,9.761 41.361,9.048 41.361,7.9 41.361,6.589 41.809,6.141 41.927,6.023 47.438,6.023 48.807,4.654 49.411,4.05 56.197,4.05 58.62,6.473 63.159,6.473 73.288,16.602 73.288,20.534 73.229,20.593 73.179,20.643 72.825,20.997 72.442,20.997 72.28,21.159 v1(72.236,21.159)
  BottomLayer w0.095: v1(72.236,21.159) 72.284,21.159 72.436,21.007 72.564,21.007 72.57,21.001 132.859,21.001 ccw(c132.859,23.538) 134.653,21.744 136.221,23.311 ccw(c134.424,25.107) 136.222,23.313 ccw(c134.424,25.107) 136.964,25.107 136.964,29.817 137.209,30.061 137.505,30.061 137.561,30.117 v1(137.561,30.45)
SFP_RX_TX_3.RD_N: IC4.AK13 J19.RT12 | length 103.4
  TopLayer w0.095: v1(136.561,31.45) IC4.AK13@137.061,31.95
  layer 8 w0.075: J19.RT12@50.411,8.875 50.45,8.914 51.255,8.914 51.358,8.81 53.193,8.81 54.508,10.125 65.197,10.125 71.763,16.691 71.763,21.35 73.14,22.727 73.14,23.551 73.427,23.838 73.93,23.838 74.084,23.684 v1(74.136,23.684)
  BottomLayer w0.095: v1(74.136,23.684) 74.288,23.836 76.161,23.836 131.178,23.836 131.304,23.836 ccw(c131.304,26.595) 133.255,24.644 133.812,25.201 ccw(c132.33,26.683) 134.426,26.683 134.426,28.094 134.187,28.333 134.187,31.076 134.95,31.839 136.505,31.839 136.561,31.783 v1(136.561,31.45)
SFP_RX_TX_3.RD_P: IC4.AJ13 J19.RT13 | length 103.1
  TopLayer w0.095: v1(136.561,32.45) IC4.AJ13@137.061,32.95
  layer 8 w0.075: J19.RT13@51.661,9.675 51.661,9.398 51.397,9.134 51.397,9.056 51.441,9.012 53.11,9.012 54.424,10.327 65.113,10.327 71.561,16.775 71.561,21.434 72.938,22.811 72.938,23.635 73.343,24.04 73.93,24.04 74.101,24.211 v1(74.136,24.211)
  BottomLayer w0.095: v1(74.136,24.211) 74.289,24.058 76.161,24.058 131.086,24.058 131.303,24.058 ccw(c131.303,26.598) 133.099,24.802 133.59,25.293 ccw(c132.108,26.775) 134.204,26.775 134.204,28.002 133.965,28.241 133.965,31.167 134.858,32.061 136.505,32.061 136.561,32.117 v1(136.561,32.45)
SFP_RX_TX_3.TD_N: IC4.AP13 J19.RT19 | length 104.8
  TopLayer w0.095: v1(136.561,27.45) IC4.AP13@137.061,27.95
  layer 8 w0.075: J19.RT19@51.661,14.475 51.661,14.198 51.418,13.955 51.418,13.835 51.462,13.792 52.544,13.792 52.962,14.209 67.495,14.209 70.884,17.598 70.884,21.682 72.236,23.034 72.236,23.962 72.354,24.081 73.52,25.246 75.108,25.246 75.47,24.885 75.588,24.766 75.588,22.269 75.529,22.21 75.032,21.713 74.296,21.713 v1(74.132,21.55)
  BottomLayer w0.095: v1(74.132,21.55) 74.207,21.55 74.341,21.684 75.161,21.684 ; 75.162,21.684 133.174,21.684 133.239,21.749 134.056,22.566 135.372,23.882 ccw(c133.421,25.833) 136.18,25.833 136.18,27.769 136.25,27.839 136.505,27.839 136.561,27.783 v1(136.561,27.45)
SFP_RX_TX_3.TD_P: IC4.AN13 J19.RT18 | length 104.5
  TopLayer w0.095: v1(136.561,28.45) IC4.AN13@137.061,28.95
  layer 8 w0.075: J19.RT18@50.411,13.675 50.429,13.693 51.276,13.693 51.379,13.59 52.628,13.59 53.046,14.007 67.579,14.007 71.086,17.514 71.086,21.598 72.438,22.95 72.438,23.879 73.603,25.044 75.025,25.044 75.386,24.683 75.386,22.353 74.948,21.915 74.294,21.915 v1(74.132,22.077)
  BottomLayer w0.095: v1(74.132,22.077) 74.179,22.077 74.35,21.906 75.069,21.906 ; 75.07,21.906 133.082,21.906 133.9,22.724 135.214,24.038 ccw(c133.418,25.834) 135.216,24.04 ccw(c133.418,25.834) 135.958,25.834 135.958,27.861 136.158,28.061 136.505,28.061 136.561,28.117 v1(136.561,28.45)
SHARED_BUS_0: IC4.AP4 R76.1 R283.1 | length 62.4
  TopLayer w0.127: v1(127.561,27.45) IC4.AP4@128.061,27.95 ; R76.1@176.926,7.686 v2(177.581,7.686) R283.1@178.236,7.686
  Layer 5 w0.127: v1(127.561,27.45) 127.561,27.448 127.961,27.048 127.961,24.95 127.961,23.269 132.174,19.056 140.049,19.056 143.496,15.609 169.658,15.609 v2(177.581,7.686)
SHARED_BUS_1: IC4.AN7 R77.1 R280.1 | length 59
  TopLayer w0.127: v1(130.561,28.45) IC4.AN7@131.061,28.95 ; R77.1@176.926,13.079 176.941,13.064 v2(177.581,13.064) ; v2@177.581,13.079 R280.1@178.236,13.079
  Layer 5 w0.127: v1(130.561,28.45) 130.036,27.925 130.036,23.61 132.882,20.764 140.757,20.764 144.204,17.317 173.343,17.317 177.581,13.079 v2(177.581,13.064)
SHARED_BUS_2: IC4.AN3 R78.1 R282.1 | length 67.4
  TopLayer w0.127: v1(126.561,28.45) IC4.AN3@127.061,28.95 ; R78.1@176.926,3.641 v2(177.581,3.641) R282.1@178.236,3.641
  Layer 5 w0.127: v1(126.561,28.45) 126.561,28.002 126.061,27.502 126.061,23.357 131.643,17.775 139.518,17.775 142.965,14.328 166.683,14.328 170.685,10.65 171.31,10.65 174.44,7.519 174.44,6.736 175.19,5.987 175.191,5.986 v2(177.581,3.641)
SHARED_BUS_3: IC4.AN6 R79.1 R284.1 | length 61.2
  TopLayer w0.127: v1(129.561,28.45) IC4.AN6@130.061,28.95 ; R79.1@176.926,10.383 v2(177.581,10.383) R284.1@178.236,10.383
  Layer 5 w0.127: v1(129.561,28.45) 129.036,27.925 129.036,23.402 132.528,19.91 140.403,19.91 143.85,16.463 171.501,16.463 v2(177.581,10.383)
SHARED_BUS_4: IC4.AP5 R81.1 R285.1 | length 61.1
  TopLayer w0.127: v1(128.561,27.45) IC4.AP5@129.061,27.95 ; R81.1@176.926,9.034 v2(177.581,9.034) R285.1@178.236,9.034
  Layer 5 w0.127: v1(128.561,27.45) 128.561,23.273 132.351,19.483 140.226,19.483 143.673,16.036 170.579,16.036 v2(177.581,9.034)
SHARED_SCL: IC15.8 IC24.12 IC25.12 IC28.22 IC29.22 IC34.12 IC38.22 R190.1 R237.1 TP3.1 | length 194
  TopLayer w0.125: TP3.1@28.461,50.15 28.361,50.05 28.361,49.55 v2(28.836,49.075) ; R190.1@44.686,48.52 44.711,48.545 v1(45.461,48.545) v1@45.414,48.498 ; v1(61.362,1.591) 61.362,1.63 61.661,1.929 61.661,5.33 62.136,5.805 62.136,7.85 62.811,8.525 62.811,13.1 62.945,13.234 62.945,14.904 62.248,15.6 62.248,16.538 v1(62.661,16.95) ; IC15.8@64.611,39.979 64.611,39.15 64.923,38.838 64.923,38.304 v5(64.966,38.262) ; v2(92.834,68.886) 92.936,68.886 93.086,68.736 IC38.22@94.297,68.736 95.168,68.736 96.318,67.586 IC34.12@97.747,67.586
  Layer 3 w0.125: v1(62.661,16.95) 64.986,19.275 64.986,38.241 v5(64.966,38.262)
  layer 8 w0.125: v5(64.966,38.262) 64.966,39.357 61.761,42.561 61.761,51.157 69.42,58.816 72.538,58.816 74.211,60.489 74.211,73.3 76.541,75.63 86.241,75.63 88.511,77.9 90.726,77.9 91.146,77.48 91.146,69.975 92.235,68.886 v2(92.834,68.886)
  BottomLayer w0.125: R237.1@27.761,50.1 28.786,49.075 v2(28.836,49.075) 29.286,49.075 30.061,49.85 32.961,49.85 33.361,49.45 44.556,49.45 v1(45.461,48.545) 46.756,47.25 50.968,47.25 54.068,44.15 58.668,44.15 63.168,39.65 64.661,39.65 64.986,39.325 64.986,38.282 v5(64.966,38.262) 64.986,38.241 64.986,36.375 63.38,34.769 56.342,34.769 55.25,35.861 53.35,35.861 50.636,38.575 IC25.12@48.908,38.575 48.858,38.625 47.684,38.625 46.434,39.875 IC29.22@45.458,39.875 ; v1@61.371,1.599 61.371,1.662 61.381,1.672 61.381,3.345 IC24.12@61.386,3.35 61.549,3.512 61.549,4.538 62.061,5.05 62.361,5.05 62.661,5.35 62.661,6.433 62.859,6.631 62.849,6.631 62.686,6.793 IC28.22@62.686,6.925
SHARED_SDA: IC15.7 IC24.13 IC25.13 IC28.23 IC29.23 IC34.13 IC38.23 R189.1 R236.1 TP2.1 | length 197.3
  TopLayer w0.125: TP2.1@26.211,50.125 26.211,50.1 26.961,49.35 v2(26.961,49.3) ; R189.1@43.461,48.545 43.506,48.5 v1(44.036,48.5) ; v2(58.076,34.26) 58.076,34.266 59.634,35.824 v2(59.634,35.83) ; v1(60.583,1.768) 61.361,2.546 61.361,7.528 62.423,8.59 62.423,11.9 62.292,12.032 62.292,14.056 62.561,14.325 62.561,14.582 v1(62.582,14.603) ; v5(63.961,38.95) 63.961,39.051 64.111,39.201 IC15.7@64.111,39.979 ; v2(92.861,67.617) 92.861,67.68 93.266,68.086 IC38.23@94.297,68.086 95.222,68.086 96.372,66.936 IC34.13@97.747,66.936
  Layer 3 w0.125: v1(62.582,14.603) 61.808,14.603 61.161,15.25 61.161,17.45 62.361,18.65 63.061,18.65 63.961,19.55 v5(63.961,38.95)
  layer 8 w0.125: v5(63.961,38.95) 61.011,41.9 61.011,51.313 69.149,59.45 72.243,59.45 73.695,60.901 73.695,73.689 76.276,76.27 85.976,76.27 88.246,78.54 90.991,78.54 91.786,77.745 91.786,70.689 92.48,69.995 93.636,69.995 93.9,69.731 93.9,68.656 v2(92.861,67.617)
  BottomLayer w0.125: R236.1@26.711,50.13 26.731,50.13 26.958,49.903 v2@26.958,49.3 ; v2(26.961,49.3) 28.211,48.05 32.361,48.05 33.261,48.95 43.586,48.95 v1(44.036,48.5) 44.036,47.775 45.061,46.75 50.761,46.75 53.861,43.65 58.461,43.65 63.161,38.95 v5(63.961,38.95) 63.961,37.75 62.061,35.85 v2@59.634,35.85 ; IC29.23@45.458,39.225 46.361,39.225 47.661,37.925 IC25.13@48.908,37.925 50.386,37.925 53.061,35.25 54.561,35.25 55.551,34.26 v2(58.076,34.26) ; v1@60.561,1.79 60.711,1.941 60.711,3.325 IC24.13@60.736,3.35 60.736,4.725 61.461,5.45 61.761,5.45 62.061,5.75 62.061,6.9 IC28.23@62.036,6.925 ; v1(62.582,14.603) v1@62.629,14.65
SLOT1.LVDS_0_N: IC4.AK28 J14.B3 | length 96.4
  TopLayer w0.095: IC4.AK28@152.061,31.95 v1(152.561,31.45)
  Layer 3 w0.075: v1(152.561,31.45) 152.561,31.805 152.517,31.849 152.298,31.849 152.154,31.705 152.154,27.73 152.154,27.174 152.313,27.015 153.862,27.015 154.139,26.737 154.139,26.251 153.862,25.974 148.844,25.974 148.684,25.815 148.684,25.496 148.844,25.337 151.876,25.337 152.154,25.059 152.154,24.879 152.154,23.847 152.436,23.564 173.795,23.564 178.375,18.985 178.375,15.894 179.904,14.365 180.436,13.832 181.711,13.832 182.66,12.884 185.748,12.884 186.294,12.338 186.294,7.971 186.675,7.589 192.214,2.05 212.098,2.05 ; 212.1,2.05 212.348,2.05 ccw(c212.348,2.163) 212.461,2.163 212.461,2.246 cw(c212.573,2.246) 212.573,2.358 cw(c212.573,2.246) 212.686,2.246 212.686,2.163 ccw(c212.798,2.163) 212.798,2.05 213.061,2.05 213.797,2.05 213.999,2.252 213.999,2.589 213.638,2.95 J14.B3@213.4,2.95
SLOT1.LVDS_0_P: IC4.AJ28 J14.A3 | length 97
  TopLayer w0.095: IC4.AJ28@152.061,32.95 v1(152.561,32.45)
  Layer 3 w0.075: v1(152.561,32.45) 152.561,32.095 152.517,32.051 152.214,32.051 151.952,31.788 151.952,27.73 151.952,27.09 152.229,26.813 153.778,26.813 153.937,26.654 153.937,26.335 153.778,26.176 148.76,26.176 148.482,25.898 148.482,25.412 148.76,25.135 151.792,25.135 151.952,24.976 151.952,24.879 151.952,23.763 152.352,23.362 173.712,23.362 178.173,18.901 178.173,15.81 178.232,15.751 179.832,14.151 180.352,13.63 181.628,13.63 182.576,12.682 185.664,12.682 186.092,12.254 186.092,7.887 186.461,7.518 192.131,1.848 212.098,1.848 213.881,1.848 214.201,2.168 214.201,2.589 214.562,2.95 J14.A3@214.8,2.95
SLOT1.LVDS_1_N: IC4.AN32 J14.E3 | length 96.5
  TopLayer w0.095: IC4.AN32@156.061,28.95 v1(156.561,28.45)
  Layer 3 w0.075: v1(156.561,28.45) 156.249,28.762 156.249,28.824 156.293,28.868 158.677,28.868 159.344,28.201 159.344,27.452 159.344,26.534 159.622,26.256 159.843,26.256 160.002,26.097 160.002,25.779 159.843,25.619 153.313,25.619 153.035,25.342 153.035,24.856 153.313,24.578 159.7,24.578 159.737,24.541 159.895,24.383 160.302,24.383 173.745,24.383 179.06,19.068 179.06,17.069 180.379,15.751 184.447,15.751 cw(c184.447,15.676) 184.497,15.731 185.673,14.651 cw(c185.444,14.403) 185.693,14.631 186.791,13.438 cw(c186.735,13.387) 186.81,13.388 186.81,9.997 187.235,9.572 187.235,7.609 187.353,7.491 190.876,3.968 190.994,3.85 191.098,3.85 191.873,3.85 192.032,3.691 192.032,2.812 192.31,2.534 192.796,2.534 193.073,2.812 193.073,4.032 193.233,4.192 193.551,4.192 193.71,4.032 193.71,2.812 193.988,2.534 194.474,2.534 194.751,2.812 194.751,4.032 194.911,4.192 195.229,4.192 195.388,4.032 195.388,2.812 195.666,2.534 196.152,2.534 196.429,2.812 196.429,4.032 196.589,4.192 196.907,4.192 197.066,4.032 197.066,2.812 197.344,2.534 197.83,2.534 198.107,2.812 198.107,3.691 198.267,3.85 198.363,3.85 209.567,3.85 209.799,3.618 209.799,3.311 209.438,2.95 J14.E3@209.2,2.95
SLOT1.LVDS_1_P: IC4.AM31 J14.D3 | length 97.2
  TopLayer w0.095: IC4.AM31@155.061,29.95 v1(155.561,29.45)
  Layer 3 w0.075: v1(155.561,29.45) 155.941,29.07 158.76,29.07 159.546,28.285 159.546,27.452 159.546,26.618 159.705,26.458 159.927,26.458 160.204,26.181 160.204,25.695 159.927,25.417 153.396,25.417 153.237,25.258 153.237,24.94 153.396,24.78 159.783,24.78 159.863,24.701 159.979,24.585 160.302,24.585 173.829,24.585 179.262,19.152 179.262,17.153 179.412,17.003 179.483,16.932 180.462,15.953 184.447,15.953 cw(c184.447,15.676) 184.634,15.88 185.808,14.801 cw(c185.444,14.403) 185.841,14.768 186.939,13.575 cw(c186.735,13.387) 187.012,13.389 cw(c186.81,13.387) 187.012,13.387 187.012,10.081 187.437,9.656 187.437,7.693 191.078,4.052 191.098,4.052 191.957,4.052 192.234,3.774 192.234,2.896 192.394,2.736 192.712,2.736 192.871,2.896 192.871,4.116 193.149,4.394 193.635,4.394 193.912,4.116 193.912,2.896 194.072,2.736 194.39,2.736 194.549,2.896 194.549,4.116 194.827,4.394 195.313,4.394 195.59,4.116 195.59,2.896 195.75,2.736 196.068,2.736 196.227,2.896 196.227,4.116 196.505,4.394 196.991,4.394 197.268,4.116 197.268,2.896 197.428,2.736 197.746,2.736 197.905,2.896 197.905,3.774 198.183,4.052 198.363,4.052 209.65,4.052 210.001,3.701 210.001,3.311 210.362,2.95 J14.D3@210.6,2.95
SLOT1.LVDS_2_N: IC4.AM34 J14.C4 | length 97.3
  TopLayer w0.095: IC4.AM34@158.061,29.95 v1(158.561,29.45)
  Layer 3 w0.075: v1(158.561,29.45) 158.561,29.805 158.605,29.849 159.26,29.849 159.261,29.848 159.802,29.848 160.145,29.506 160.145,26.707 160.204,26.647 160.744,26.107 161.483,25.368 166.647,25.368 166.827,25.368 167.105,25.646 167.105,26.117 167.264,26.276 167.583,26.276 167.742,26.117 167.742,25.038 168.02,24.76 168.505,24.76 168.783,25.038 168.783,26.015 168.942,26.174 169.261,26.174 169.42,26.015 169.42,25.646 169.698,25.368 170.495,25.368 174.727,25.368 175.372,25.368 175.746,24.994 175.746,24.769 175.157,24.18 175.157,23.788 175.501,23.444 175.893,23.444 176.557,24.107 176.782,24.107 177.007,23.882 177.007,23.657 176.344,22.994 176.344,22.601 176.687,22.257 177.08,22.257 177.743,22.921 177.968,22.921 178.194,22.696 178.194,22.471 177.53,21.807 177.53,21.414 177.874,21.071 178.266,21.071 178.93,21.734 179.155,21.734 179.38,21.509 179.38,21.284 178.717,20.62 178.717,20.228 179.06,19.884 179.453,19.884 180.116,20.548 180.341,20.548 180.567,20.323 180.567,20.097 179.903,19.434 179.903,19.041 180.247,18.698 180.639,18.698 181.228,19.286 181.453,19.286 181.521,19.218 181.521,18.733 182.546,17.709 183.841,17.709 185.304,16.246 185.422,16.128 186.494,16.128 188.048,14.574 188.048,8.12 188.166,8.001 189.876,6.291 190.072,6.095 190.072,5.524 190.349,5.247 190.835,5.247 191.113,5.524 191.113,5.891 191.272,6.05 191.591,6.05 191.75,5.891 191.75,4.843 192.027,4.566 192.513,4.566 192.791,4.843 192.791,5.891 192.95,6.05 193.269,6.05 193.428,5.891 193.428,4.846 193.705,4.569 194.191,4.569 194.469,4.846 194.469,5.891 194.628,6.05 194.947,6.05 195.106,5.891 195.106,4.846 195.383,4.569 195.869,4.569 196.147,4.846 196.147,5.891 196.306,6.05 196.625,6.05 196.784,5.891 196.784,4.846 197.061,4.569 197.547,4.569 197.825,4.846 197.825,5.691 197.984,5.85 198.081,5.85 212.378,5.85 212.699,5.529 212.699,5.311 212.338,4.95 J14.C4@212.1,4.95
SLOT1.LVDS_2_P: IC4.AL34 J14.B4 | length 97.6
  TopLayer w0.095: IC4.AL34@158.061,30.95 v1(158.561,30.45)
  Layer 3 w0.075: v1(158.561,30.45) 158.561,30.095 158.605,30.051 159.343,30.051 159.344,30.05 159.886,30.05 160.347,29.589 160.347,26.79 161.567,25.57 166.647,25.57 166.744,25.57 166.903,25.729 166.903,26.2 167.181,26.478 167.666,26.478 167.944,26.2 167.944,25.122 168.103,24.962 168.422,24.962 168.581,25.122 168.581,26.098 168.859,26.376 169.344,26.376 169.622,26.098 169.622,25.729 169.781,25.57 170.495,25.57 174.929,25.57 175.455,25.57 175.948,25.078 175.948,24.685 175.359,24.096 175.359,23.871 175.584,23.646 175.81,23.646 176.473,24.309 176.866,24.309 177.209,23.966 177.209,23.573 176.546,22.91 176.546,22.685 176.771,22.459 176.996,22.459 177.66,23.123 178.052,23.123 178.396,22.779 178.396,22.387 177.732,21.723 177.732,21.498 177.957,21.273 178.183,21.273 178.846,21.936 179.239,21.936 179.582,21.593 179.582,21.2 178.919,20.537 178.919,20.312 179.144,20.086 179.369,20.086 180.033,20.75 180.425,20.75 180.769,20.406 180.769,20.014 180.105,19.35 180.105,19.125 180.33,18.9 180.556,18.9 181.144,19.488 181.537,19.488 181.664,19.361 181.723,19.302 181.723,18.817 182.629,17.911 183.925,17.911 185.506,16.33 186.577,16.33 188.25,14.657 188.25,8.203 189.876,6.577 190.274,6.179 190.274,5.608 190.433,5.449 190.752,5.449 190.911,5.608 190.911,5.974 191.188,6.252 191.674,6.252 191.952,5.974 191.952,4.927 192.111,4.768 192.43,4.768 192.589,4.927 192.589,5.974 192.866,6.252 193.352,6.252 193.63,5.974 193.63,4.93 193.789,4.771 194.108,4.771 194.267,4.93 194.267,5.974 194.544,6.252 195.03,6.252 195.308,5.974 195.308,4.93 195.467,4.771 195.786,4.771 195.945,4.93 195.945,5.974 196.222,6.252 196.708,6.252 196.986,5.974 196.986,4.93 197.145,4.771 197.464,4.771 197.623,4.93 197.623,5.774 197.9,6.052 198.081,6.052 212.462,6.052 212.901,5.613 212.901,5.311 213.262,4.95 J14.B4@213.5,4.95
SLOT1.LVDS_3_N: IC4.AP30 J14.I4 | length 97.5
  TopLayer w0.095: IC4.AP30@154.061,27.95 v1(154.561,27.45)
  layer 8 w0.075: v1(154.561,27.45) 154.206,27.45 154.162,27.406 154.162,26.783 154.162,26.282 153.809,25.93 150.339,25.93 150.105,25.695 150.105,25.227 150.339,24.993 153.876,24.993 154.229,24.64 154.229,24.004 153.876,23.652 150.339,23.652 150.105,23.417 150.105,22.949 150.339,22.715 153.876,22.715 154.229,22.362 154.229,21.726 153.876,21.374 150.339,21.374 150.105,21.139 150.105,20.671 150.339,20.437 153.876,20.437 154.229,20.084 154.229,19.448 153.876,19.096 150.896,19.096 150.662,18.861 150.662,18.393 150.896,18.159 153.809,18.159 154.162,17.806 154.162,17.626 154.162,16.903 154.815,16.25 156.497,14.567 173.647,14.567 173.849,14.365 174.357,13.857 179.25,13.857 179.309,13.798 180.36,12.747 182.343,12.747 182.524,12.928 185.954,12.928 194.832,4.05 204.186,4.05 204.299,4.163 204.299,4.601 203.949,4.95 J14.I4@203.7,4.95
SLOT1.LVDS_3_P: IC4.AP29 J14.H4 | length 98.1
  TopLayer w0.095: IC4.AP29@153.061,27.95 v1(153.561,27.45)
  layer 8 w0.075: v1(153.561,27.45) 153.916,27.45 153.96,27.406 153.96,26.783 153.96,26.366 153.726,26.132 150.256,26.132 149.903,25.779 149.903,25.143 150.256,24.791 153.793,24.791 154.027,24.556 154.027,24.088 153.793,23.854 150.256,23.854 149.903,23.501 149.903,22.865 150.256,22.513 153.793,22.513 154.027,22.278 154.027,21.81 153.793,21.576 150.256,21.576 149.903,21.223 149.903,20.587 150.256,20.235 153.793,20.235 154.027,20 154.027,19.532 153.793,19.298 150.812,19.298 150.46,18.945 150.46,18.309 150.812,17.957 153.726,17.957 153.96,17.722 153.96,17.626 153.96,16.819 154.6,16.179 156.354,14.425 156.413,14.365 173.563,14.365 174.273,13.655 179.166,13.655 179.9,12.921 180.276,12.545 182.427,12.545 182.608,12.726 185.871,12.726 194.749,3.848 204.27,3.848 204.501,4.079 204.501,4.601 204.85,4.95 J14.H4@205.1,4.95
SLOT1.LVDS_4_N: IC4.AP34 J14.L4 | length 97.3
  TopLayer w0.095: IC4.AP34@158.061,27.95 v1(158.561,27.45)
  layer 8 w0.075: v1(158.561,27.45) 158.561,27.805 158.605,27.849 159.033,27.849 159.359,27.523 159.359,26.809 157.934,25.384 157.359,24.809 157.359,24.5 157.2,24.34 154.881,24.34 154.604,24.063 154.604,23.577 154.881,23.299 157.808,23.299 157.967,23.14 157.967,22.822 157.808,22.662 154.881,22.662 154.604,22.385 154.604,21.899 154.881,21.621 157.808,21.621 157.967,21.462 157.967,21.144 157.808,20.984 154.881,20.984 154.604,20.707 154.604,20.221 154.881,19.943 157.808,19.943 157.967,19.784 157.967,19.466 157.808,19.306 154.881,19.306 154.604,19.029 154.604,18.543 154.881,18.265 157.808,18.265 157.967,18.106 157.967,17.788 157.808,17.628 155.226,17.628 154.948,17.351 154.948,16.865 155.226,16.587 157.2,16.587 157.359,16.428 157.359,16.331 157.359,15.985 157.582,15.762 175.356,15.762 175.545,15.573 176.158,14.961 182.617,14.961 182.736,14.842 182.945,14.633 183.755,13.823 186.668,13.823 191.286,9.205 191.354,9.137 191.413,9.078 191.806,9.078 192.351,9.623 192.576,9.623 192.801,9.398 192.801,9.172 191.881,8.252 191.881,7.86 192.225,7.516 192.618,7.516 193.538,8.436 193.763,8.436 193.988,8.211 193.988,7.986 193.068,7.066 193.068,6.673 193.412,6.33 193.804,6.33 193.87,6.396 194.095,6.396 194.165,6.326 194.234,6.257 194.641,5.85 199.911,5.85 200.099,5.662 200.099,5.299 199.749,4.95 J14.L4@199.5,4.95